# Altium PCB PCB_BQ51013BYFPR.PcbDoc
Units mm, origin at the board's own origin, x right, y up, seen from the top; angles counter-clockwise.
Board outline 45 x 20 mm, 2 copper layers (Top Layer, Bottom Layer); 61 components, 48 nets, 200 pads, 50 vias.
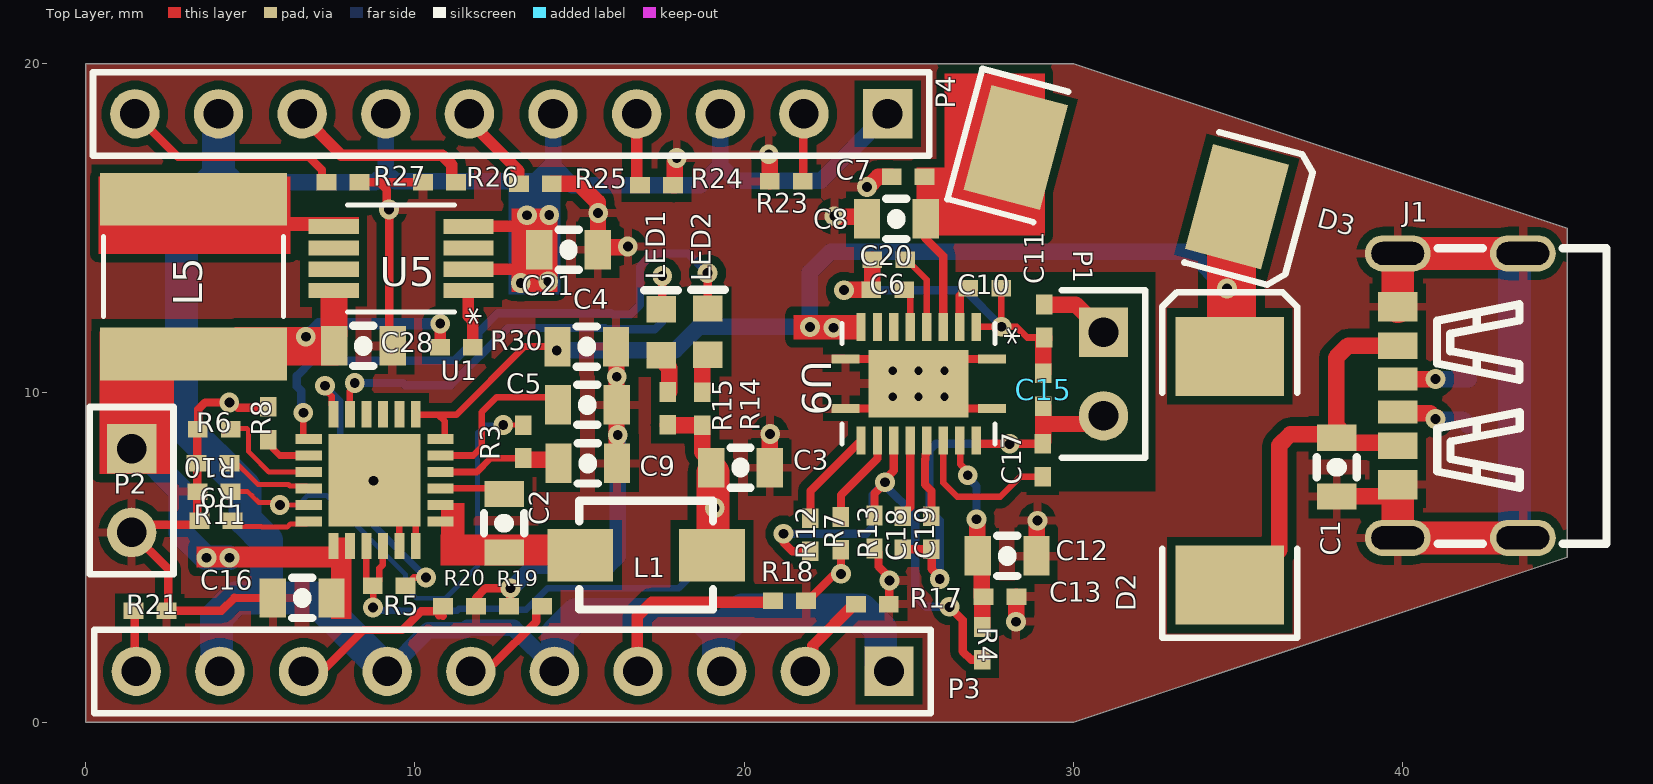
[diagram p0: Top Layer view]
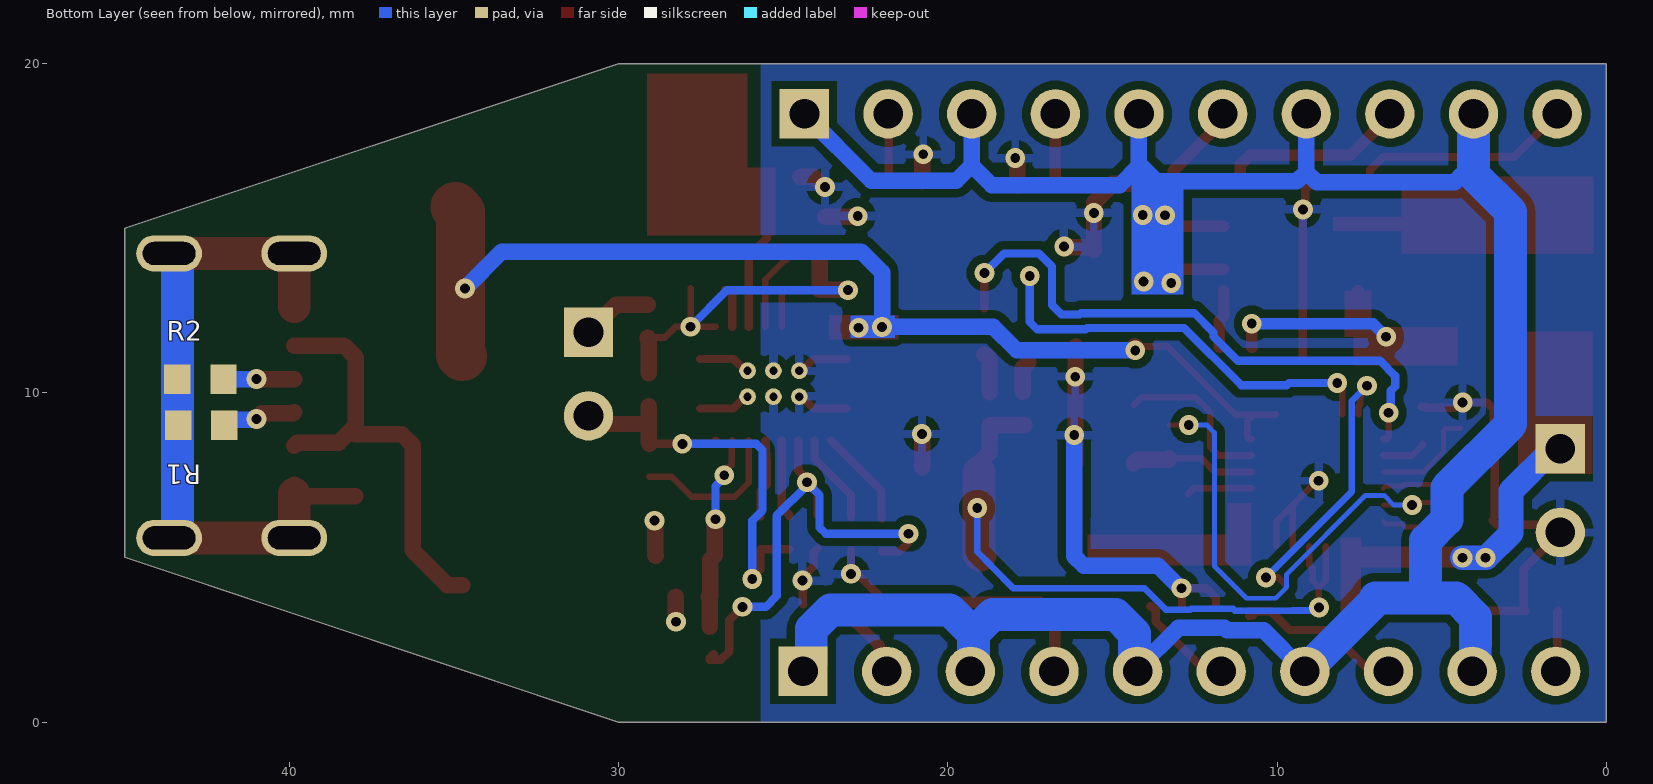
[diagram p1: Bottom Layer view, seen from below]

## Layer stack, top to bottom
Top Solder: solder mask 0.0102, Solder Resist, Dk 3.5
Top Layer: signal copper 0.0356
Dielectric 1: dielectric 0.32, FR-4, Dk 4.8
Bottom Layer: signal copper 0.0356
Bottom Solder: solder mask 0.0102, Solder Resist, Dk 3.5

## Board outline
0,0 30,0 45,5 45,15 30,20 0,20

## Design rules (kind name [scope] priority, off if disabled: settings)
Clearance U1 [InComponent('U1')] p1: gap=0.254 ignorepadtopadclearanceinfootprint=FALSE except(0: Arc-Hole Track-Hole SMDPad-Hole THPad-Hole Via-Hole Fill-Hole Poly-Hole Region-Hole Text-Hole; 0.18: Arc-Arc Arc-Track Arc-SMDPad Track-Track Track-SMDPad SMDPad-SMDPad)
Clearance U5 [InComponent('U5')] p2: gap=0.254 ignorepadtopadclearanceinfootprint=FALSE except(0: Arc-Hole Track-Hole SMDPad-Hole THPad-Hole Via-Hole Fill-Hole Poly-Hole Region-Hole Text-Hole; 0.18: Arc-Arc Arc-Track Arc-SMDPad Arc-THPad Track-Track Track-SMDPad Track-THPad SMDPad-SMDPad SMDPad-THPad THPad-THPad; 0.2: Arc-Via Track-Via)
Clearance U2 [InComponent('U2')] p3: gap=0.254 ignorepadtopadclearanceinfootprint=FALSE except(0: Arc-Hole Track-Hole SMDPad-Hole THPad-Hole Via-Hole Fill-Hole Poly-Hole Region-Hole Text-Hole; 0.15: Arc-Arc Arc-Track Arc-SMDPad Arc-THPad Track-Track Track-SMDPad Track-THPad SMDPad-SMDPad SMDPad-THPad SMDPad-Via SMDPad-Fill SMDPad-Poly SMDPad-Region THPad-THPad Via-Via Via-Fill Via-Poly Via-Region Via-Text)
Clearance [All] p4: gap=0.254 ignorepadtopadclearanceinfootprint=FALSE except(0: Arc-Hole Track-Hole SMDPad-Hole THPad-Hole Via-Hole Fill-Hole Poly-Hole Region-Hole Text-Hole; 0.2: Arc-Arc Arc-Track Arc-SMDPad Track-Track Track-SMDPad SMDPad-SMDPad)
MinimumSolderMaskSliver USB-C-SMD_TYPE-C-USB-13 [HasFootprint('USB-C-SMD_TYPE-C-USB-13')] p1: minsoldermaskwidth=0
MinimumSolderMaskSliver RHL20_2P05X3P05 [HasFootprint('RHL20_2P05X3P05')] p2: minsoldermaskwidth=0
MinimumSolderMaskSliver [All] p3: minsoldermaskwidth=0.1
PolygonConnect [All] p1: connectstyle=Relief reliefconductorwidth=0.254 reliefentries=4 polygonreliefangle="90 Angle" airgapwidth=0.254
RoutingVias [All] p1: holewidth=0.711 width=1.27 viastyle="Through Hole" minholewidth=0.3 minwidth=0.6 maxholewidth=0.711 maxwidth=1.27
SilkToSilkClearance [All] p1: silktosilkclearance=0.1
SilkToSolderMaskClearance 0805-CAP [HasFootprint('0805-CAP')] p1: minsilkscreentomaskgap=0 clearancetoexposedcopper=TRUE
SilkToSolderMaskClearance 1608[0603]_LED [HasFootprint('1608[0603]_LED')] p2: minsilkscreentomaskgap=0 clearancetoexposedcopper=TRUE
SilkToSolderMaskClearance 0402-A [HasFootprint('0402-A')] p3: minsilkscreentomaskgap=0 clearancetoexposedcopper=TRUE
SilkToSolderMaskClearance [IsPad] p4: minsilkscreentomaskgap=0.1 clearancetoexposedcopper=TRUE
SolderMaskExpansion [All] p1: expansion=0.102 istentingtop=FALSE
Width [All] p1: maxlimit=1.5 minlimit=0.15 preferedwidth=0.254
27 further rules are at their usual default settings.

## Components (designator, comment, footprint, x,y, rotation, side; value= is the part's Value field where it differs from the comment)
C1 "Cap" 0805-CAP 38.025,7.76 r270 top value=1uF
C2 "Cap" 0805-CAP 12.737,6.056 r270 top value=47nF/25V
C3 "Cap" 0805-CAP 19.91,7.7 r180 top value=10uF/25V
C4 "Cap" 0805-CAP 15.24,11.38 r180 top value=1uF/25V
C5 "Cap" 0805-CAP 15.22,9.66 r0 top value=10uF/25V
C6 "Cap" 0402-A 24.361,13.128 r0 top value=22nF/25V
C7 "Cap" 0402-A 24.982,16.564 r0 top value=0.1uF/16V
C8 "Cap" 0805-CAP 24.605,15.306 r0 top value=10uF/16V
C9 "Cap" 0805-CAP 15.27,7.83 r180 top value=4.7uF/10V
C10 "Cap" 0402-A 27.31,13.17 r180 top value=10nF/25V
C11 "Cap" 0402-A 29.11,12.18 r270 top value=0.25uF/25V
C12 "Cap" 0805-CAP 28.01,5.02 r180 top value=10uF/16V
C13 "Cap" 0402-A 27.77,3.81 r180 top value=0.1uF/16V
C15 "Cap" 0402-A 29.085,10.092 r90 top value=2.5nF/25V
C16 "Cap" 0805-CAP 6.598,3.743 r180 top value=10uF/16V
C17 "Cap" 0402-A 29.07,7.95 r270 top value=10nF/25V
C18 "Cap" 0402-A 24.82,5.75 r90 top value=22nF/25V
C19 "Cap" 0402-A 25.691,5.749 r90 top value=0.47uF/25V
C20 "Cap" 0402-A 24.392,14.042 r0 top value=0.47uF/25V
C21 "Cap" 0805-CAP 14.65,14.37 r0 top value=10uF/25V
C28 "Cap" 0805-CAP 8.457,11.397 r180 top value=10uF/25V
D2 "SK56A-LTP" SMC 34.752,7.632 r90 top
D3 "SK56A-LTP" SMC 31.612,16.551 r345 top
J1 "USB 3.1 C 6PF COPY" USB-C-SMD_TYPE-C-USB-13 42,10 r90 top
L1 "1uH" IND-SMD_L4.1-W3.2 17.2,5.07 r0 top
L5 "4.7uH" IND_BOURNS_SRN50 3.28,13.53 r90 top value=SRN5020-4R7M
LED1 "LED0" 1608[0603]_LED 17.48,11.842 r90 top
LED2 "LED0" 1608[0603]_LED 18.9,11.86 r90 top
P1 "Header 2" HDR1X2 30.916,11.84 r270 top
P2 "Header 2" HDR1X2 1.401,8.3 r270 top
P3 "Header 10" HDR1X10 24.4,1.54 r180 top
P4 "Header 10" HDR1X10 24.358,18.472 r180 top
R1 "Res1" 1608[0603] 42.68,9.019 r0 bottom value=5.1k
R2 "Res1" 1608[0603] 42.702,10.407 r180 bottom value=5.1k
R3 "Res1" 0402-A 13.288,8.517 r270 top value=10k
R4 "Res1" 0402-A 27.24,2.39 r270 top value=20K
R5 "Res1" 0402-A 9.22,4.14 r180 top value=10K
R6 "Res1" 0402-A 3.908,8.893 r180 top value=10K
R7 "Res1" 0402-A 22.94,5.73 r270 top value=10k
R8 "Res1" 0402-A 5.548,9.074 r90 top value=158R
R9 "Res1" 0402-A 3.9,7 r0 top value=10k
R10 "Res1" 0402-A 3.87,7.855 r180 top value=221R
R11 "Res1" 0402-A 3.96,6.12 r180 top value=10K
R12 "Res1" 0402-A 22.003,5.689 r270 top value=66R
R13 "Res1" 0402-A 23.961,5.772 r270 top value=196R
R14 "Res1" 0402-A 18.726,9.517 r90 top value=10K
R15 "Res1" 0402-A 17.683,9.528 r90 top value=2.21K
R17 "Res1" 0402-A 23.896,3.577 r180 top value=1K
R18 "Res1" 0402-A 21.38,3.68 r180 top value=1K
R19 "Res1" 0402-A 13.364,3.514 r0 top value=1K
R20 "Res1" 0402-A 11.357,3.514 r180 top value=1K
R21 "Res1" 0402-A 1.957,3.386 r180 top value=1K
R23 "Res1" 0402-A 21.28,16.42 r0 top value=1K
R24 "Res1" 0402-A 17.34,16.3 r180 top value=1K
R25 "Res1" 0402-A 13.661,16.344 r180 top value=1K
R26 "Res1" 0402-A 10.75,16.39 r0 top value=1K
R27 "Res1" 0402-A 7.82,16.39 r180 top value=1K
R30 "Res1" 0402-A 11.263,11.378 r0 top value="1M Ohm"
U1 "BQ25616JRTWR" QFN50P400X400X80 8.772,7.354 r270 top
U5 "MCP1643T-I/MS" MSOP8_MC_MCH 9.585,14.078 r180 top
U9 "BQ51013BRHLR" RHL20_2P05X3P05 25.298,10.277 r270 top

## Footprints (in the part's own frame and the unit in brackets; to place one, negate y for a bottom-side part, rotate by r counter-clockwise, add the part's x,y. Pads: shape width x height; smd on the part's side, far side on the other; paste and mask are expansions set on the pad)
0402-A [mm] "Chip Inductor, Body 1.0x0.5mm, IPC High Density"
  rect 0.6x0.5 smd: 1(-0.5,0) 2(0.5,0)
  body extent -0.55,-0.3 0.55,0.3, height 0.55
0805-CAP [mil]
  rect 31.5x47.2 smd: 1(-34.25,-1) 2(35.75,-1)
  silkscreen extent -11,-25 13,23
1608[0603] [mm] "Chip Capacitor, Body 1.6x0.8mm, IPC High Density"
  rect 0.8x0.9 smd: 1(-0.7,0) 2(0.7,0)
  body extent -0.87,-0.48 0.87,0.48, height 1.3
1608[0603]_LED [mm] "Chip Capacitor, Body 1.6x0.8mm, IPC High Density"
  rect 0.8x0.9 smd: 1(-0.7,0) 2(0.7,0)
  silkscreen extent 1.27,-0.51 1.27,0.51, body extent -0.87,-0.48 0.87,0.48, height 1.3
HDR1X2 [mm] "Connector; Header; 2 Position"
  rect 1.5x1.5 hole 0.9: 1(0,0)
  round 1.5 hole 0.9: 2(2.54,0)
  silkscreen extent -1.27,-1.27 3.81,1.27
HDR1X10 [mm] "Connector; Header; 10 Position"
  rect 1.5x1.5 hole 0.9: 1(0,0)
  round 1.5 hole 0.9: 2(2.54,0) 3(5.08,0) 4(7.62,0) 5(10.16,0) 6(12.7,0) 7(15.24,0) 8(17.78,0) 9(20.32,0) 10(22.86,0)
  silkscreen extent -1.27,-1.27 24.13,1.27
IND-SMD_L4.1-W3.2 [mm]
  rect 2x1.6 smd: 1(-2.175,0) 2(1.825,0)
  silkscreen extent -2.21,-1.65 1.86,1.65
IND_BOURNS_SRN50 [mil]
  rect 63x224 smd: 1(-92.5,0) 2(92.5,0)
  silkscreen extent -48,-108 48,108
MSOP8_MC_MCH [mil]
  rect 60x18 smd: 1(-80.5,38.39) 2(-80.5,12.8) 3(-80.5,-12.8) 4(-80.5,-38.39) 5(80.5,-38.39) 6(80.5,-12.8) 7(80.5,12.8) 8(80.5,38.39)
  silkscreen extent -64,-64 64,64
QFN50P400X400X80 [mil]
  rect 31.5x11.81 smd: 1(-78.43,49.53) 2(-78.43,29.85) 3(-78.43,10.15) 4(-78.43,-9.52) 5(-78.43,-29.21) 6(-78.43,-48.89) 13(79.05,-48.89) 14(79.05,-29.21) 15(79.05,-9.52) 16(79.05,10.15) 17(79.05,29.85) 18(79.05,49.53)
  rect 11.81x31.5 smd: 7(-48.9,-78.42) 8(-29.22,-78.42) 9(-9.53,-78.42) 10(10.15,-78.42) 11(29.84,-78.42) 12(49.52,-78.42) 19(49.52,79.06) 20(29.84,79.06) 21(10.15,79.06) 22(-9.53,79.06) 23(-29.22,79.06) 24(-48.9,79.06)
  rect 110.24x110.24 smd: 25(0.31,0.32)
RHL20_2P05X3P05 [mm]
  rect 0.28x0.85 smd: 1(-0.75,2.225) 10(-0.75,-2.225) 11(0.75,-2.225) 20(0.75,2.225)
  rect 0.85x0.28 smd: 2(-1.725,1.75) 3(-1.725,1.25) 4(-1.725,0.75) 5(-1.725,0.25) 6(-1.725,-0.25) 7(-1.725,-0.75) 8(-1.725,-1.25) 9(-1.725,-1.75) 12(1.725,-1.75) 13(1.725,-1.25) 14(1.725,-0.75) 15(1.725,-0.25) 16(1.725,0.25) 17(1.725,0.75) 18(1.725,1.25) 19(1.725,1.75)
  rect 2.05x3.05 smd: 21(0,0)
  round 0.508 hole 0.254 mask-25.4: 22(-0.394,-0.787) 23(-0.394,0) 24(-0.394,0.787) 25(0.394,-0.787) 26(0.394,0) 27(0.394,0.787)
  silkscreen extent -1.83,-2.32 1.83,2.32
SMC [mm] "DO-214-AB/SMC; 2 C-Bend Leads; Body 7.9 x 5.9 mm, inc. leads (LxW)"
  rect 2.4x3.3 smd: 1(-3.475,0) 2(3.475,0)
  silkscreen extent -5.07,-2.05 5.43,2.05
USB-C-SMD_TYPE-C-USB-13 [mm]
  oval 1.1x2 hole 0.7 slot 1.6 at 90 deg: 0(-4.407,-1.652) 0(-4.407,2.148) 0(4.233,-1.652) 0(4.233,2.148)
  rect 0.7x1.2 smd: A5(-0.587,2.146) B5(0.413,2.146)
  rect 0.8x1.2 smd: A9(-1.607,2.148) B9(1.433,2.15)
  rect 0.9x1.2 smd: A12(-2.787,2.148) B12(2.613,2.148)
  silkscreen extent -4.59,-4.19 4.39,0.95

## Part data
C1 C2 C3 C4 C5 C6 C7 C8 C9 C10 C11 C12 C13 C15 C16 C17 C18 C19 C20 C21 C28: "Capacitor", LatestRevisionDate=17-Jul-2002, LatestRevisionNote="Re-released for DXP Platform.", PackageDescription="Radial Cap, Thru-Hole; 2 Leads; 0.3 in Pin Spacing", PackageReference=RAD-0.3, Published=8-Jun-2000, Publisher="Altium Limited"
D2 D3: library part Diode, "DIODE SCHOTTKY 5A 60V SMA", Code_JEDEC=DO-214-AB, LatestRevisionDate=17-Jul-2002, LatestRevisionNote="Re-released for DXP Platform.", PackageDescription="DO-214-AB/SMC; 2 C-Bend Leads; Body 7.9 x 5.9 mm, inc. leads (LxW)", PackageReference=SMC, PackageVersion=Sep-1996, Published=8-Jun-2000, Publisher="Altium Limited"
L1: library part Inductor
L5: library part SRN5020-4R7M, Mfr_Name="Bourns Electronics", C="Copyright (C) 2015 Accelerated Designs. All rights reserved", Copyright="Copyright (C) 2022 Ultra Librarian. All rights reserved.", Manufacturer_Part_Number=SRN5020-4R7M
P1 P2: "Header, 2-Pin", LatestRevisionDate=17-Jul-2002, LatestRevisionNote="Re-released for DXP Platform.", Publisher="Altium Limited"
P3 P4: "Header, 10-Pin", LatestRevisionDate=17-Jul-2002, LatestRevisionNote="Re-released for DXP Platform.", Publisher="Altium Limited"
R1 R2 R3 R4 R5 R6 R7 R8 R9 R10 R11 R12 R13 R14 R15 R17 R18 R19 R20 R21 R23 R24 R25 R26 R27 R30: "Resistor", LatestRevisionDate=17-Jul-2002, LatestRevisionNote="Re-released for DXP Platform.", PackageDescription="Axial Device, Thru-Hole; 2 Leads; 0.3 in Pin Spacing", PackageReference=AXIAL-0.3, Published=8-Jun-2000, Publisher="Altium Limited"
U5: Mfr_Name=Microchip, C="Copyright (C) 2018 Accelerated Designs. All rights reserved", Copyright="Copyright (C) 2022 Ultra Librarian. All rights reserved.", Manufacturer_Part_Number=MCP1643T-I/MS
U9: Mfr_Name="Texas Instruments", Copyright="Copyright (C) 2022 Ultra Librarian. All rights reserved.", Digi-Key_Part_Number_1=296-38885-1-ND, Digi-Key_Part_Number_2=296-38885-2-ND, Digi-Key_Part_Number_3=296-38885-6-ND, Digi-Key_Part_Number_4=BQ51013BRHLR-ND, Manufacturer_Part_Number=BQ51013BRHLR

## Via types
v1: diameter 0.6, hole 0.3, Top Layer to Bottom Layer, tented both sides, 39 vias
v2: diameter 0.6, hole 0.3, Top Layer to Bottom Layer, 11 vias

## Nets (pads, with @x,y where several pads share a name; then routed paths per layer and width w, separated by ;. In a path a pad name is that pad's centre, name@x,y a point inside that pad or via, vN(x,y) a via of type N, cw(c..) or ccw(c..) an arc to the next point about the centre after c; other vN are vias at no path point)
+5: C21.1 P3.1 P3.3 P3.5 P3.7 P3.9 P4.1 P4.3 P4.5 P4.7 P4.9 U5.2 U5.4 | length 77.2
  Top Layer w0.35: U5.2 13.388,13.753 13.78,14.145 C21.1 13.78,14.544 13.271,15.053 U5.4
  Bottom Layer w0.5: 4.384,16.626 4.61,16.4 8.805,16.4 9.118,16.713 ; P4.7 9.118,16.713 ; P3.7 10.414,2.794 11.534,2.794 11.6,2.86 13,2.86 14.24,1.62 P3.5 ; P4.5 14.198,16.958 ; P4.3 19.278,16.912 ; P4.1 22.326,16.44 19.75,16.44 19.278,16.912 ; 9.118,16.713 9.411,16.42 13.66,16.42 14.198,16.958 ; 14.198,16.958 14.198,16.892 14.784,16.306 18.672,16.306 19.278,16.912
  Bottom Layer w1: P4.9 4.038,16.626 2.911,15.499 2.911,9.05 4.848,7.113 4.848,6.152 5.49,5.51 5.49,3.77 ; P3.9 3.984,1.636 3.984,2.351 3.98,2.356 3.98,3.184 4.566,3.77 5.49,3.77 ; P3.7 7.019,3.681 7.019,3.77 5.49,3.77 ; P3.5 14.336,1.636 14.336,2.696 14.91,3.27 18.639,3.27 19.224,2.684 ; P3.3 19.224,1.636 19.224,2.684 ; P3.1 24.15,1.79 24.15,2.824 23.564,3.41 19.95,3.41 19.224,2.684
  other v1: 13.217,13.335
  other v2: 14.056,13.377 13.405,15.392 14.082,15.397
+VBAT: C16.1 C28.2 L5.1 P2.1 R30.1 U1.13 U1.14 U5.8 | length 15.2
  Top Layer w0.35: v2(3.67,4.99) 3.68,5 4.36,5 v2@4.37,5.01 ; v2(4.37,4.99) 5.767,4.99 5.787,5.01 7.634,5.01 U1.13@7.634,5.023 ; v1(6.691,11.702) 6.973,11.42 7.1,11.42 C28.2@7.505,11.825 ; U5.8 U5.8@7.549,13.094 ; R30.1 10.768,11.383 10.768,12.096 v1(10.772,12.101)
  Bottom Layer w0.35: v1(6.691,11.702) 7.089,12.101 v1(10.772,12.101)
  Bottom Layer w0.75: P2.1 1.62,8.3 2.901,7.019 2.901,5.739 3.65,4.99 v2(3.67,4.99) v2(4.37,4.99)
C_VCC: C4.2 D2.2 D3.2 U1.1 U1.24 U9.9 | length 33.9
  Top Layer w0.2: U1.1 10.046,9.33 10.72,9.33 ; U1.24 10.86,8.596 10.91,8.646 10.91,9.14 10.72,9.33 ; C4.2 C4.2 13.335,11.405 11.26,9.33 10.72,9.33
  Top Layer w0.5: v1(14.31,11.29) 14.33,11.31 C4.2 C4.2@14.33,11.407
  Top Layer w1.5: D2.2 34.802,11.157 34.802,15.485 D3.2
  Bottom Layer w0.5: v1(14.31,11.29) 15.801,11.29 16.467,11.29 17.912,11.29 18.623,12.001 21.999,12.001 v1(22,12) 22,13.66 22.63,14.29 33.55,14.29 v1(34.67,13.17)
  other v1: 22.71,11.977
FOD: R4.2 R12.2 R13.1 U9.14 | length 15.4
  Top Layer w0.25: v1(21.2,5.72) 21.2,5.45 21.461,5.189 R12.2 ; R13.1 23.961,6.947 24.282,7.268 v1(24.282,7.282) ; v1@24.28,7.35 24.28,7.375 24.548,7.643 U9.14 ; v1(26.24,3.5) 26.64,3.1 26.64,2.15 26.9,1.89 R4.2 27.24,1.94 R4.2@27.115,2.065
  Bottom Layer w0.25: v1(21.2,5.72) 23.71,5.72 23.9,5.91 23.9,6.9 v1(24.282,7.282) 24.282,7.187 25.2,6.269 25.2,3.83 25.53,3.5 v1(26.24,3.5)
GND: C1.2 C3.1 C4.1 C5.2 C7.1 C8.1 C9.1 C12.1 C13.1 C16.2 C21.2 C28.1 J1.0 J1.A12 J1.B12 P2.2 R1.2 R2.1 R6.2 R7.2 R8.2 R9.1 R10.2 R11.2 R13.2 R17.1 R18.1 R19.1 R20.1 R21.1 R23.1 R24.1 R25.1 R26.1 R27.1 U1.17 U1.18 U1.25 U9.1 U9.10 U9.11 U9.20 U9.21 U9.22 U9.23 U9.24 U9.25 U9.26 U9.27 | length 80.8
  Top Layer w0.2: U1.25 U1.25@9.53,6.596 ; U1.17 U1.25@9.53,6.596 ; U1.18 10.03,6.096 U1.25@9.53,6.596
  Top Layer w0.25: v1@22.94,4.503 R7.2@22.94,5.23 ; U9.11 24.085,9.527 24.441,9.884 U9.25 ; U9.10 24.085,11.027 24.441,10.671 U9.22 ; R13.2 24.086,5.147 24.086,4.727 24.417,4.396 v2(24.417,4.302) ; U9.27 26.156,9.884 26.512,9.527 U9.20 ; U9.24 26.156,10.671 26.512,11.027 U9.1
  Top Layer w0.254: R11.2@3.389,6.261 3.389,8.031 3.394,8.036 3.394,8.988 3.422,9.016 3.422,9.497 3.633,9.707 v1(4.367,9.707) 4.461,9.707 4.626,9.542 5.484,9.542 5.515,9.573 R8.2@5.607,9.573 ; R11.2 3.337,5.997 1.638,5.997 P2.2 2.512,4.65 2.512,3.441 R21.1 4.13,3.386 4.518,3.774 4.524,3.768 C16.2 ; R27.1 8.93,16.39 ; C28.1@9.218,11.123 v1(9.218,15.564) 9.152,15.63 9.152,16.168 8.93,16.39 ; R26.1 8.93,16.39 ; R20.1 11.858,3.77 12.153,4.065 v2(12.909,4.065) 12.893,4.05 R19.1@12.893,3.514 ; R18.1 21.93,3.68 v1@22.702,4.452 ; R17.1 24.407,3.588 24.407,4.291 v2(24.417,4.302)
  Top Layer w0.5: R25.1 14.996,16.344 15.55,15.79 15.55,15.482 v1(15.569,15.463) 15.564,15.457 C21.2@15.564,14.35 ; C21.2 C21.2@15.564,14.35 ; C4.1 16.125,11.39 16.125,7.87 C9.1 ; v1(16.47,14.44) 16.451,14.421 15.634,14.421 C21.2@15.564,14.35 ; R24.1 17.89,16.3 17.89,17.036 17.955,17.101 v1(17.955,17.128) ; v1(20.75,17.244) 20.75,17.217 20.78,17.187 R23.1 ; C3.1 20.786,7.732 20.786,8.746 v1(20.793,8.753) ; v1(22.738,15.365) 22.75,15.352 23.71,15.352 C8.1@23.722,15.339 ; v1(23.735,16.252) 23.762,16.252 24.074,16.564 C7.1 ; v1(28.261,3.046) 28.265,3.051 28.265,3.81 C13.1 ; C12.1 28.894,5.06 28.894,6.103 v1(28.909,6.117) ; C1.2 39.774,6.852 J1.A12@39.852,6.93 ; J1.A12@39.729,7.09 J1.A12
  Top Layer w1: J1.0@39.375,14.233 39.852,14.233 J1.0@43.652,14.233 ; J1.0@39.852,5.593 J1.A12@39.852,6.93 ; J1.B12 J1.0@39.852,14.233 ; J1.0@39.852,5.593 J1.0@43.652,5.593
  Bottom Layer w0.5: v2(12.909,4.065) 12.936,4.065 13.62,4.75 15.877,4.75 16.17,5.043 16.17,6.22 16.164,6.226 v2(16.164,8.716)
  Bottom Layer w1: J1.0@43.652,5.593 43.448,5.593 43.402,5.639 R2.1 43.402,14.187 43.448,14.233 J1.0@43.652,14.233
  other v1: 22.941,4.502
  other v2: 8.74,7.33 16.134,10.486
NetC1_1: C1.1 D2.1 J1.A9 J1.B9 | length 13.2
  Top Layer w0.5: D2.1 35.202,4.157 36.26,5.216 36.26,5.645 36.25,5.655 36.25,8.4 36.59,8.74 C1.1@38.005,8.74 ; J1.B9 38.343,11.433 37.98,11.07 37.98,9.01 38.502,8.488 39.758,8.488 J1.A9
NetC2_1: C2.1 U1.21 | length 2
  Top Layer w0.2: U1.21 12.542,7.096 C2.1
NetC2_2: C2.2 L1.1 U1.19 U1.20
NetC5_1: C5.1 U1.23 | length 5
  Top Layer w0.2: U1.23 11.776,8.096 12.033,8.353 12.033,9.413 12.49,9.87 14.115,9.87 C5.1
NetC6_1: C6.1 C10.1 C11.2 C15.2 C20.1 U9.2 | length 11.5
  Top Layer w0.2: U9.2 28.278,12.002 28.6,11.68 C11.2 ; C10.1 27.81,12.012 v1(27.816,12.006)
  Top Layer w0.5: v1(23.033,13.117) 23.045,13.128 C6.1 23.892,13.128 C20.1 ; C15.2 29.085,11.605 29.11,11.63 C11.2
  Bottom Layer w0.25: v1(23.033,13.117) 26.705,13.117 v1(27.816,12.006)
NetC6_2: C6.2 U9.6 | length 1.2
  Top Layer w0.2: C6.2 24.898,13.128 25.048,12.978 U9.6
NetC7_2: C7.2 C8.2 D3.1 U9.4 | length 3.6
  Top Layer w0.25: C8.2@25.5,15.339 25.5,14.704 26.048,14.156 U9.4
NetC10_2: C10.2 U9.3 | length 1.3
  Top Layer w0.15: C10.2@26.548,12.958 26.76,13.17 C10.2
  Top Layer w0.25: U9.3 C10.2@26.548,12.958
NetC11_1: C11.1 P1.1 | length 2.2
  Top Layer w0.5: C11.1 30.076,12.68 P1.1
NetC12_2: C12.2 C13.2 R4.1 U9.18 | length 6
  Top Layer w0.2: U9.18 26.571,8.529 26.571,7.827 26.793,7.605 v1(26.793,7.497)
  Top Layer w0.5: v1(27.06,6.16) 27.079,6.141 27.079,5.068 C12.2 27.22,4.927 27.22,3.81 C13.2@27.24,3.81 ; R4.1 C13.2@27.24,3.81 ; C13.2 C13.2@27.24,3.81
  Bottom Layer w0.25: v1(26.793,7.497) 26.793,7.429 27.06,7.163 v1(27.06,6.16)
NetC15_1: C15.1 C17.1 C18.1 C19.1 P1.2 U9.19 | length 13.6
  Top Layer w0.25: C18.1 C19.1@25.691,5.25 ; C19.1 25.697,5.244 25.697,4.656 25.942,4.41 v1(25.942,4.347) ; U9.19 27.048,8.465 27.063,8.45 v1(28.067,8.45) C17.1
  Top Layer w0.5: C17.1 29.07,8.5 29.085,8.515 29.085,9.053 ; C15.1 29.085,9.053 ; P1.2 30.668,9.053 29.085,9.053
  Bottom Layer w0.25: v1(25.942,4.347) 25.942,6.119 25.63,6.431 25.63,8.26 25.82,8.45 v1(28.067,8.45)
NetC17_2: C17.2 U9.17 | length 4.7
  Top Layer w0.2: U9.17 26.048,7.267 26.472,6.843 27.783,6.843 28.39,7.45 C17.2
NetC18_2: C18.2 U9.15 | length 2.4
  Top Layer w0.25: C18.2 24.82,6.3 25.046,6.526 25.046,8.55 U9.15
NetC19_2: C19.2 U9.16 | length 2.4
  Top Layer w0.25: U9.16 25.533,8.537 25.533,8.149 25.513,8.129 25.513,7.993 25.496,7.975 25.496,7.218 25.691,7.023 C19.2
NetC20_2: C20.2 U9.5 | length 2.3
  Top Layer w0.2: C20.2 24.942,14.042 25.548,13.436 U9.5
NetJ1_A5: J1.A5 R1.1 | length 2.3
  Top Layer w0.5: J1.A5 39.887,9.38 40.84,9.38 40.94,9.28 v1@40.99,9.28
  Bottom Layer w0.5: v1(40.996,9.206) 41.015,9.186 41.83,9.186 41.98,9.036 R1.1
NetJ1_B5: J1.B5 R2.2 | length 2.2
  Top Layer w0.5: J1.B5 40.996,10.413 v1(41.003,10.42)
  Bottom Layer w0.5: v1(41.003,10.42) 41.009,10.413 41.995,10.413 R2.2
NetL5_2: L5.2 U5.5
NetLED1_1: LED1.1 R15.2 | length 1
  Top Layer w0.5: LED1.1@17.564,10.923 17.723,10.764 R15.2@17.723,10.028
NetLED1_2: LED1.2 U1.5 | length 13.8
  Top Layer w0.2: U1.5 8.03,10.043 8.176,10.189 v1(8.176,10.298)
  Top Layer w0.25: LED1.2@17.515,12.324 v1(17.515,13.551)
  Bottom Layer w0.25: v1(8.176,10.298) 9.639,10.298 9.708,10.229 11.089,10.229 12.829,11.969 15.775,11.969 15.814,11.93 17.29,11.93 17.515,12.155 v1(17.515,13.551)
NetLED2_1: LED2.1 R14.2 | length 1.2
  Top Layer w0.5: R14.2 18.726,11.01 18.876,11.16 LED2.1
NetLED2_2: LED2.2 U1.7 | length 18.3
  Top Layer w0.2: v1(6.615,9.395) 6.615,8.646 6.665,8.596 U1.7
  Top Layer w0.25: v1(18.89,13.64) 18.9,13.63 LED2.2
  Bottom Layer w0.25: v1(6.615,9.395) 6.548,9.462 6.548,10.064 6.417,10.195 6.417,10.517 6.877,10.977 11.2,10.977 11.932,11.708 11.932,11.832 12.519,12.419 15.962,12.419 16.001,12.38 16.552,12.38 16.836,12.664 16.836,13.832 17.234,14.23 18.3,14.23 v1(18.89,13.64)
NetP3_2: P3.2 R17.2 | length 2.7
  Top Layer w0.35: P3.2 22.08,1.76 22.08,2.311 23.346,3.577 R17.2
NetP3_4: P3.4 R18.2 | length 6
  Top Layer w0.35: P3.4 16.76,1.56 16.76,3.21 17.19,3.64 20.84,3.64 R18.2
NetP3_6: P3.6 R19.2 | length 3.2
  Top Layer w0.254: P3.6 11.938,1.778 12.411,1.778 13.691,3.059 13.691,3.391 13.814,3.514 R19.2
NetP3_8: P3.8 R20.2 | length 5.2
  Top Layer w0.25: P3.8 7.18,1.54 8.44,2.8 9.62,2.8 10.184,3.364 10.857,3.364 10.732,3.239
NetP3_10: P3.10 R21.2 | length 1.9
  Top Layer w0.254: R21.2 1.498,3.344 1.498,1.582 P3.10
NetP4_2: P4.2 R23.2 | length 2.1
  Top Layer w0.25: R23.2 21.799,16.439 21.799,18.453 P4.2
NetP4_4: P4.4 R24.2 | length 2.2
  Top Layer w0.35: P4.4 16.738,16.375 16.813,16.3 R24.2
NetP4_6: P4.6 R25.2 | length 2.8
  Top Layer w0.35: P4.6 11.878,18.252 11.878,18.026 13.161,16.743 R25.2
NetP4_8: P4.8 R26.2 | length 5.8
  Top Layer w0.35: P4.8 6.578,18.412 7.772,17.218 10.832,17.218 11.125,16.925 11.125,16.465 11.2,16.39 R26.2
NetP4_10: P4.10 R27.2 | length 6.8
  Top Layer w0.254: P4.10 2.808,17.162 6.788,17.162 7.18,16.77 7.18,16.513 7.303,16.39 R27.2
NetR3_1: R3.1 R9.2 U1.11 | length 16.1
  Top Layer w0.15: R9.2 4.925,7 5.05,6.875 5.253,6.672 5.694,6.672 5.771,6.595 v1@5.771,6.587 ; v1@5.772,6.589 6.455,6.589 U1.11 ; v2(12.687,9.022) 13.284,9.022 R3.1
  Bottom Layer w0.15: v1(5.902,6.589) 6.458,6.589 6.752,6.883 7.316,6.883 9.711,4.489 9.711,4.096 10.046,3.761 10.931,3.761 11.91,4.74 11.91,8.79 12.142,9.022 v2(12.687,9.022)
NetR5_1: R5.1 U1.6 | length 8.8
  Top Layer w0.2: v1(7.27,10.216) 7.27,10.108 7.48,9.898 7.48,9.646 7.53,9.596 U1.6 ; R5.1 9.97,4.39 v1(10.34,4.39)
  Bottom Layer w0.2: v1(7.27,10.216) 7.74,9.746 7.74,6.99 v1(10.34,4.39)
NetR6_1: R6.1 U1.9 | length 3.3
  Top Layer w0.15: R6.1@4.41,8.91 4.9,8.91 4.953,8.857 4.953,8.21 5.028,8.136 ; 5.029,8.136 5.569,7.596 U1.9
NetR7_1: R7.1 U9.13 | length 2.8
  Top Layer w0.25: R7.1 22.94,6.9 24.048,8.008 U9.13
NetR8_1: R8.1 U1.8 | length 1.4
  Top Layer w0.2: R8.1@5.587,8.458 5.587,8.408 5.899,8.096 U1.8
NetR10_1: R10.1 U1.10 | length 2.8
  Top Layer w0.15: R10.1@4.378,8.02 4.428,8.02 5.231,7.218 6.162,7.218 6.209,7.171 6.705,7.171 U1.10
NetR11_1: R11.1 U1.12 | length 2.5
  Top Layer w0.15: R11.1 4.635,5.945 5.34,5.945 5.365,5.92 6.122,5.92 6.223,6.021 6.705,6.021 U1.12
NetR12_1: R12.1 U9.12 | length 3
  Top Layer w0.25: R12.1 22.02,6.206 22.02,7.024 U9.12
NetR30_2: R30.2 U5.1 | length 1.8
  Top Layer w0.35: U5.1 11.63,12.318 11.763,12.185 R30.2
REGN: C9.2 R3.2 U1.22 | length 3.9
  Top Layer w0.2: U1.22 11.886,7.596 12.307,8.017 R3.2
  Top Layer w0.5: R3.2 13.288,7.967 14.25,7.967 C9.2
SYS: C3.2 L1.2 R5.2 R14.1 R15.1 U1.15 U1.16 | length 21.2
  Top Layer w0.2: U1.15 8.53,4.29 8.68,4.14 R5.2 ; v1(8.732,3.479) 8.732,4.128 R5.2 ; U1.16 9.03,4.775 8.92,4.666 8.92,4.29 8.77,4.14 R5.2
  Top Layer w0.254: L1.2@18.962,5.007 L1.2
  Top Layer w0.5: R15.1 17.683,9.017 R14.1 18.726,8.2 19.054,7.873 C3.2@19.054,7.575 ; L1.2@18.888,5.007 L1.2@18.962,5.007
  Top Layer w1: L1.2 19.054,5.099 C3.2@19.054,7.575
  Bottom Layer w0.2: v1(8.732,3.479) 8.822,3.389 9.524,3.389 9.527,3.386 11.288,3.386 11.342,3.44 12.609,3.44 12.638,3.411 13.381,3.411 14.04,4.07 18.02,4.07 18.68,4.73 18.68,4.743 19.11,5.173 v1(19.11,6.5)
pads on no net: U1.2 U1.3 U1.4 U5.3 U5.6 U5.7 U9.7 U9.8

## Polygon pours and split planes (outlines as drawn)
GND on Top Layer "GND_L01_P001" (solid, pour order 1): 0,0 30,0 45,5 45,15 30,20 0,20
GND on Bottom Layer "GND_L02_P000" (solid, pour order 0): 0,20 0,0 25.681,0 25.689,-0.007 25.692,-0.005 25.692,19.991 25.683,20

## Other copper
Top Layer:
  rectangle net C_VCC: 21.5,11.62 23.61,12.37
  rectangle net NetC7_2: 26.09,14.78 29.135,19.7
  rectangle net NetC7_2: 25.23,14.78 29.135,16.85
  rectangle net NetC2_2: 10.782,4.753 15.754,5.7
  rectangle net NetC2_2: 10.8,4.773 11.51,6.658
  rectangle net +VBAT: 7.14,11.69 7.95,13.103
  rectangle net +VBAT: 4.52,10.833 7.68,12
  rectangle net +5: 12.93,13.06 14.33,15.59
  rectangle net NetL5_2: 5.76,14.91 8.299,15.334
  rectangle net +VBAT: 3.37,4.69 7.634,5.33
  rectangle net +VBAT: 7.459,3.126 8.082,5.609
  rectangle net +VBAT: 0.431,7.54 2.69,11.855
  pour cut-out: 26.435,13.674 32.5,13.674 32.5,7 26.432,7 26.434,7.002 26.434,13.674
  region net NetL5_2: 6.21,14.22 0.4,14.22 0.4,16.56 6.21,16.56
Bottom Layer:
  rectangle net C_VCC: 21.601,11.665 22.961,12.347
  rectangle net +5: 12.84,12.98 14.42,16.68

## Silkscreen, mask and mechanical layers (free items; w line width, h text height)
Mechanical 1:
  the board outline again, w0.254

## Dimensions
45,5 to 30,0 on Mechanical 2
30,20 to 45,15 on Mechanical 2
45,15 to 45,5 on Mechanical 2
0,0 to 30,0 on Mechanical 2
0,20 to 0,0 on Mechanical 2
0,20 to 30,20 on Mechanical 2

## Text inside footprints (layer, text, board x,y; h text height)
U5: Top Overlay "*" at 11.226,12.605 h0.79 r270; Mechanical 1 "*" at 11.226,12.605 h0.79 r270
U9: Top Overlay "*" at 27.589,11.984 h0.79 r270; Mechanical 1 "*" at 27.574,11.979 h0.79 r270